# Altium PCB PCB1.pcbdoc
Units mil, origin at the board's own origin, x right, y up, seen from the top; angles counter-clockwise.
Board outline 2600 x 2600 mil, 2 copper layers (Top Layer, Bottom Layer); 11 components, 7 nets, 22 pads, 0 vias.
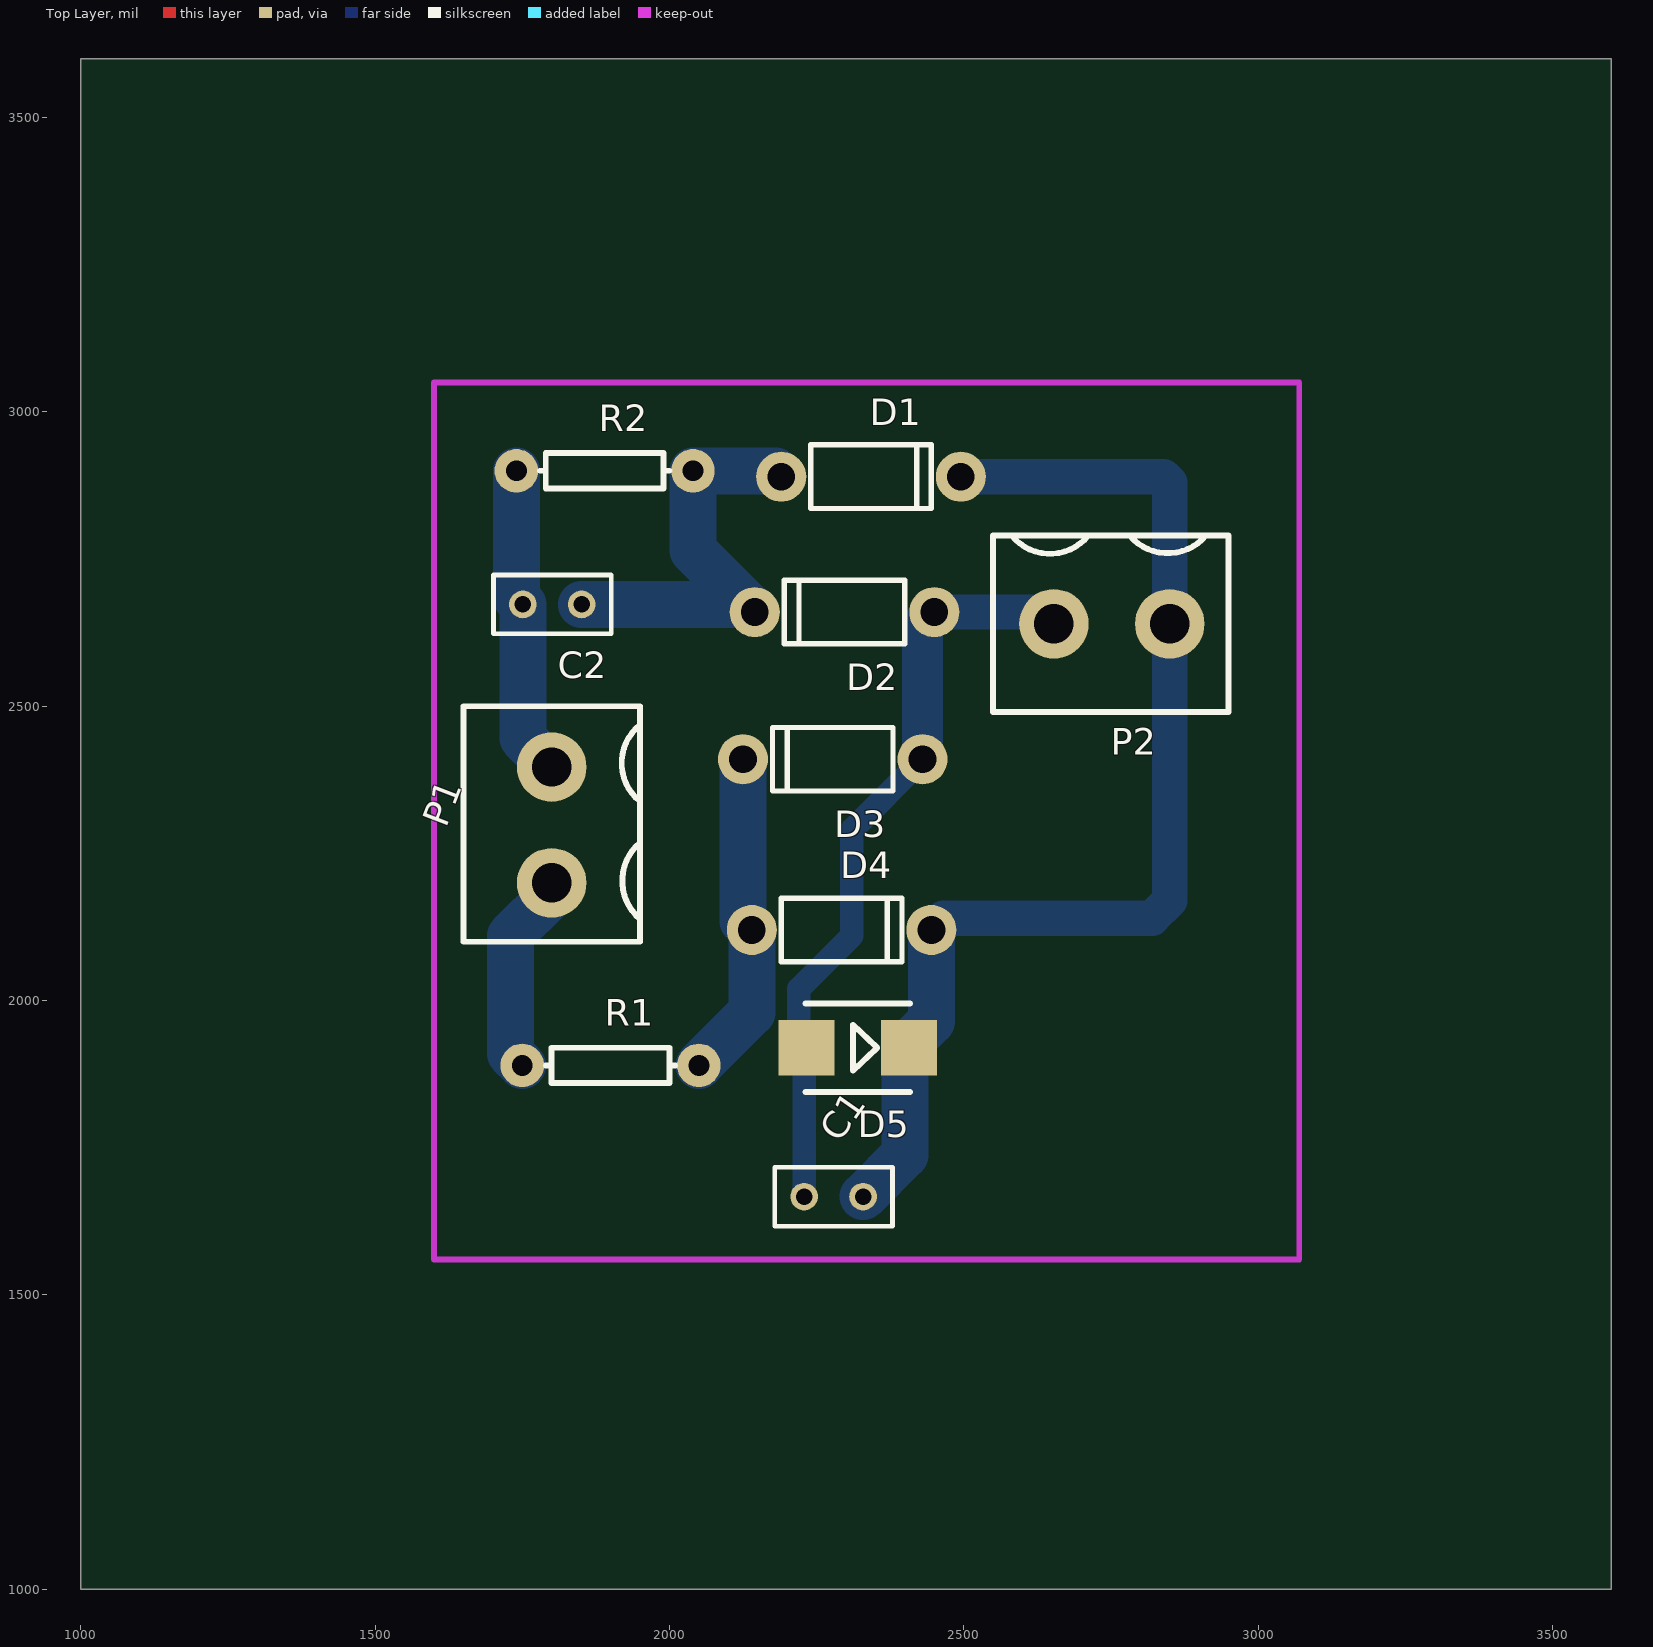
[diagram p0: Top Layer view]
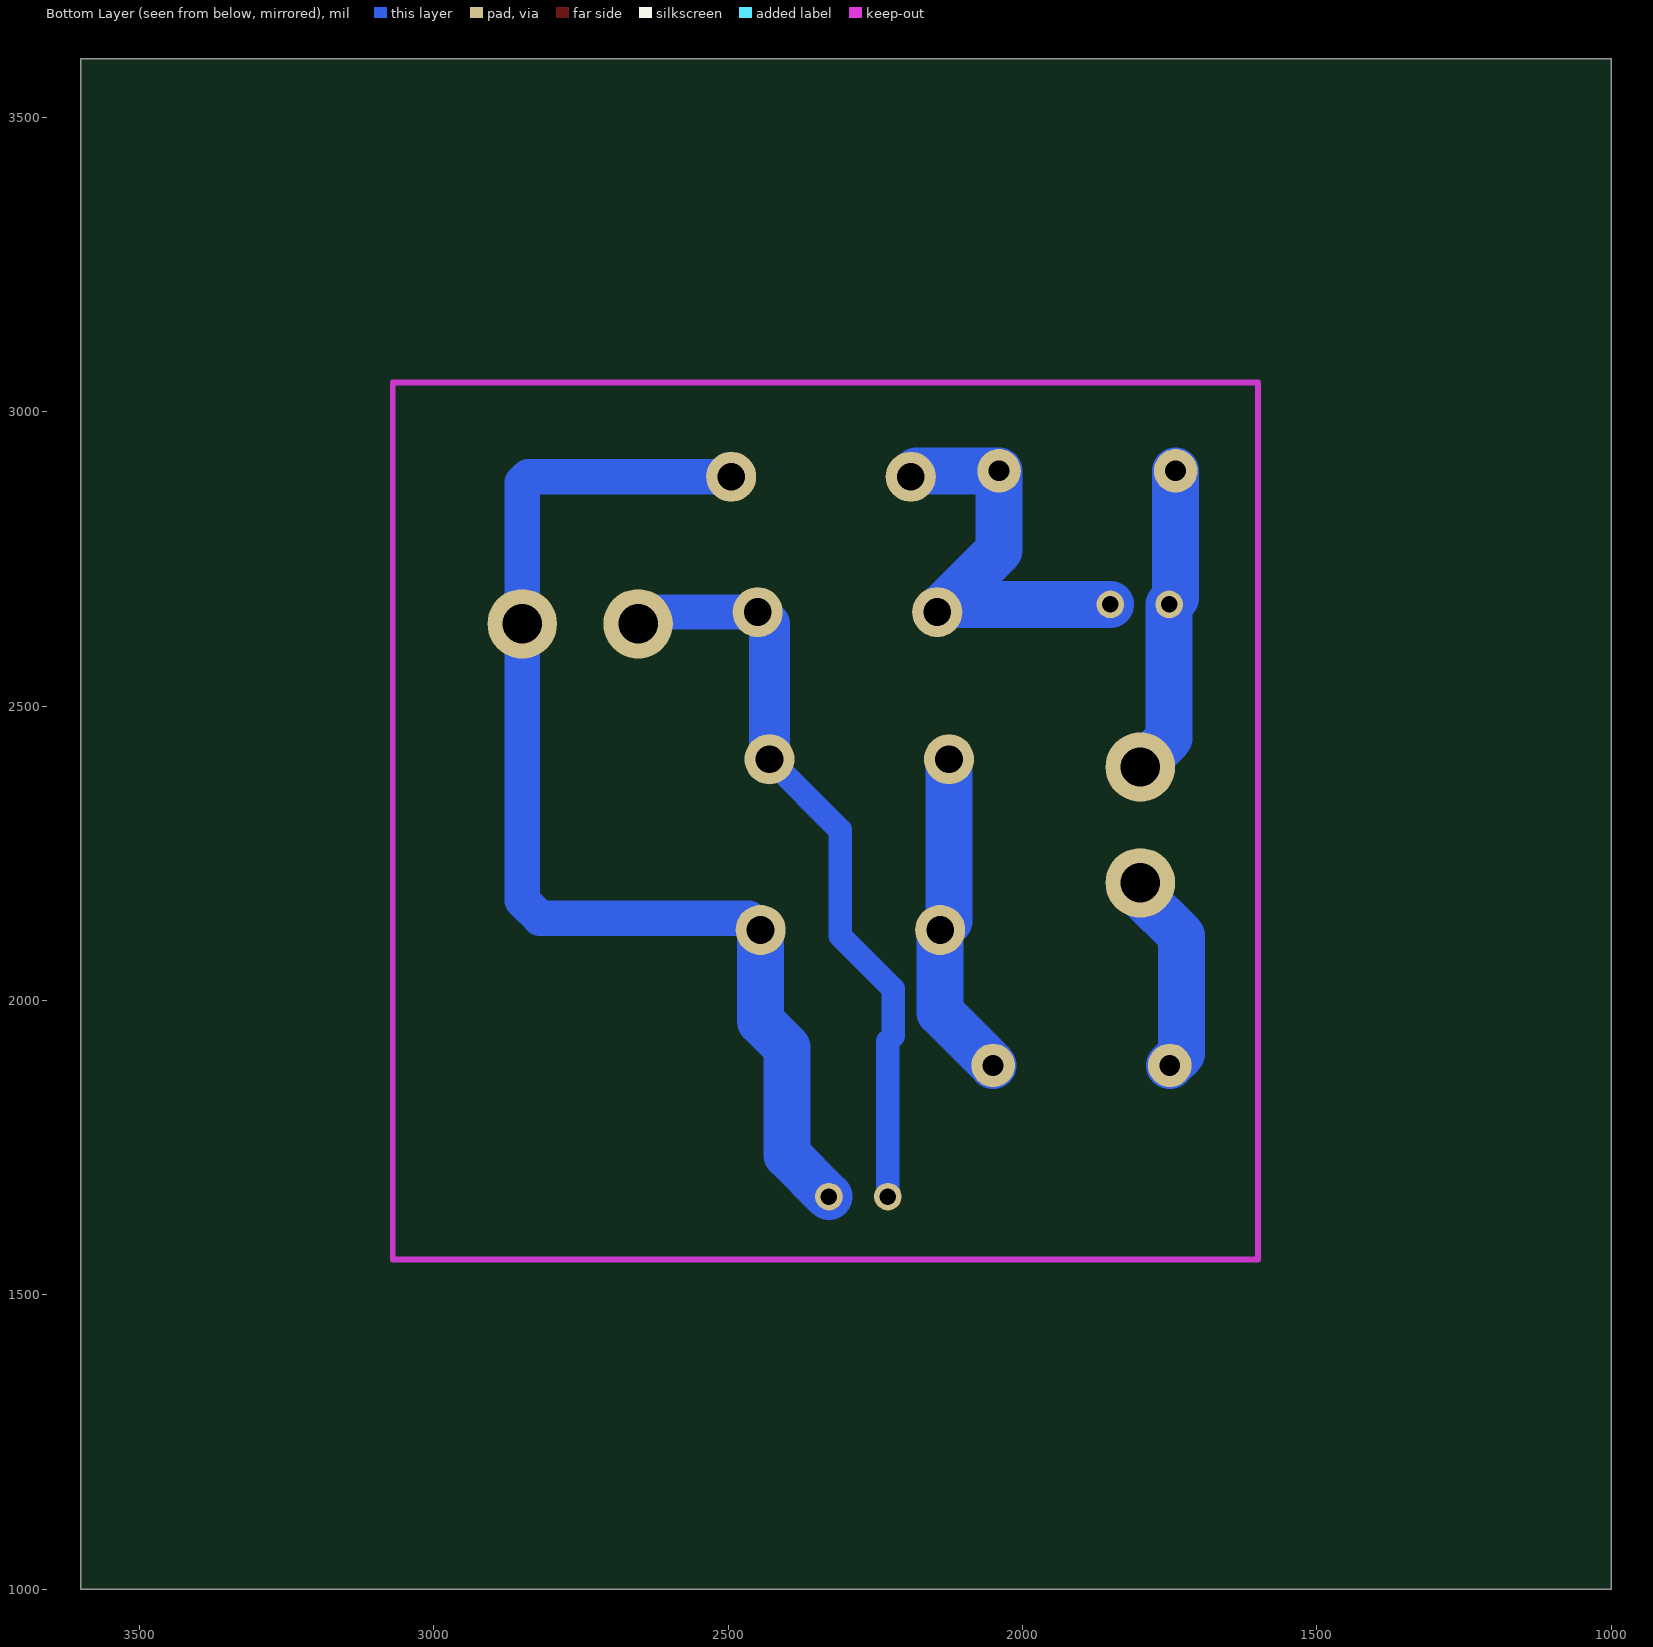
[diagram p1: Bottom Layer view, seen from below]

## Layer stack, top to bottom
Top Solder: solder mask 0.4, Solder Resist, Dk 3.5
Top Layer: signal copper 1.4
Dielectric1: dielectric 12.6, FR-4, Dk 4.8
Bottom Layer: signal copper 1.4
Bottom Solder: solder mask 0.4, Solder Resist, Dk 3.5

## Board outline
3600,1000 1000,1000 1000,3600 3600,3600

## Design rules (kind name [scope] priority, off if disabled: settings)
Clearance [All] p1: gap=10 ignorepadtopadclearanceinfootprint=FALSE
PolygonConnect [All] p1: connectstyle=Relief reliefconductorwidth=10 reliefentries=4 polygonreliefangle="90 Angle" airgapwidth=10
RoutingVias [All] p1: holewidth=28 width=50 viastyle="Through Hole" minholewidth=28 minwidth=50 maxholewidth=28 maxwidth=50
SolderMaskExpansion [All] p1: expansion=0 istentingtop=FALSE
Width [All] p1: maxlimit=10 minlimit=10 preferedwidth=10
30 further rules are at their usual default settings.

## Components (designator, comment, footprint, x,y, rotation, side; value= is the part's Value field where it differs from the comment)
C1 "1u" ?#1 2270,1660 r0 top
C2 "1u" ?#1 1810,2680 r180 top
D1 "1N4007RLG" ?#2 2190,2890 r0 top
D2 "1N4007RLG" ?#2 2450,2660 r180 top
D3 "1N4007RLG" ?#2 2430,2410 r180 top
D4 "1N4007RLG" ?#2 2140,2120 r0 top
D5 "1SMB5925BT3G" ?#3 2320,1920 r180 top
P1 "WJ2EDGVC-5.08-2P" ?#4 1800,2300 r90 top
P2 "WJ2EDGVC-5.08-2P" ?#4 2750,2640 r180 top
R1 "1k" ?#5 1750,1890 r0 top
R2 "1k" ?#5 1740,2900 r0 top

## Footprints (in the part's own frame and the unit in brackets; to place one, negate y for a bottom-side part, rotate by r counter-clockwise, add the part's x,y. Pads: shape width x height; smd on the part's side, far side on the other; paste and mask are expansions set on the pad)
?#1 [mil]
  round 47 hole 28 paste-99999 mask+2: 1(-41,7) 2(59,7)
  silkscreen extent -91,-43 109,57
?#2 [mil]
  round 85 hole 47.24 paste-99999 mask+2: 1(0,0) 2(305,0)
  silkscreen extent 50,-54 255,54
?#3 [mil]
  rect 94.5x94.5 smd paste+0 mask+2: 1(87,0) 2(-87,0)
  silkscreen extent -89,-75 89,75
?#4 [mil]
  round 118.11 hole 66.93 paste-99999 mask+2: 1(-100,0) 2(96.8,0)
  silkscreen extent -200,-150 200,150
?#5 [mil]
  round 74 hole 35.4 paste-99999 mask+2: 1(0,0) 2(300,0)
  silkscreen extent 40,-30 260,30

## Nets (pads, with @x,y where several pads share a name; then routed paths per layer and width w, separated by ;. In a path a pad name is that pad's centre, name@x,y a point inside that pad or via, vN(x,y) a via of type N, cw(c..) or ccw(c..) an arc to the next point about the centre after c; other vN are vias at no path point)
D1_2: C1.2 D1.2 D4.2 D5.2 P2.1 | length 1995.9
  Bottom Layer w60: D4.2 2465,2140 2820,2140 2850,2170 P2.1 2850,2880 2840,2890 D1.2
  Bottom Layer w80: C1.2 2400,1738 2400,1920 2445,1965 D4.2
D2_1: C1.1 D2.1 D3.1 D5.1 P2.2 | length 1303.5
  Bottom Layer w40: C1.1 2229,1931 2220,1940 2220,2020 2310,2110 2310,2290 D3.1
  Bottom Layer w60: D2.1 2633.2,2660 P2.2
  Bottom Layer w70: D3.1 2430,2640 D2.1
GND: 
R1_1: P1.1 R1.1 | length 347.3
  Bottom Layer w80: R1.1 1730,1910 1730,2110 1800,2180 P1.1
R1_2: D3.2 D4.1 R1.2 | length 563.5
  Bottom Layer w80: R1.2 2140,1980 D4.1 2125,2135 D3.2
R2_1: C2.2 P1.2 R2.1 | length 528.1
  Bottom Layer w80: R2.1 1740,2684 C2.2 1751,2445.8 P1.2
R2_2: C2.1 D1.1 D2.2 R2.2 | length 737
  Bottom Layer w80: C2.1 2132,2673 D2.2 2040,2765 R2.2 2180,2900 D1.1